# Altium PCB blinky.PcbDoc
Units mil, origin at the board's own origin, x right, y up, seen from the top; angles counter-clockwise.
Board outline 1000 x 800 mil, 2 copper layers (Top, Bottom), stack 0 mil thick; 3 components, 3 nets, 6 pads, 1 vias.
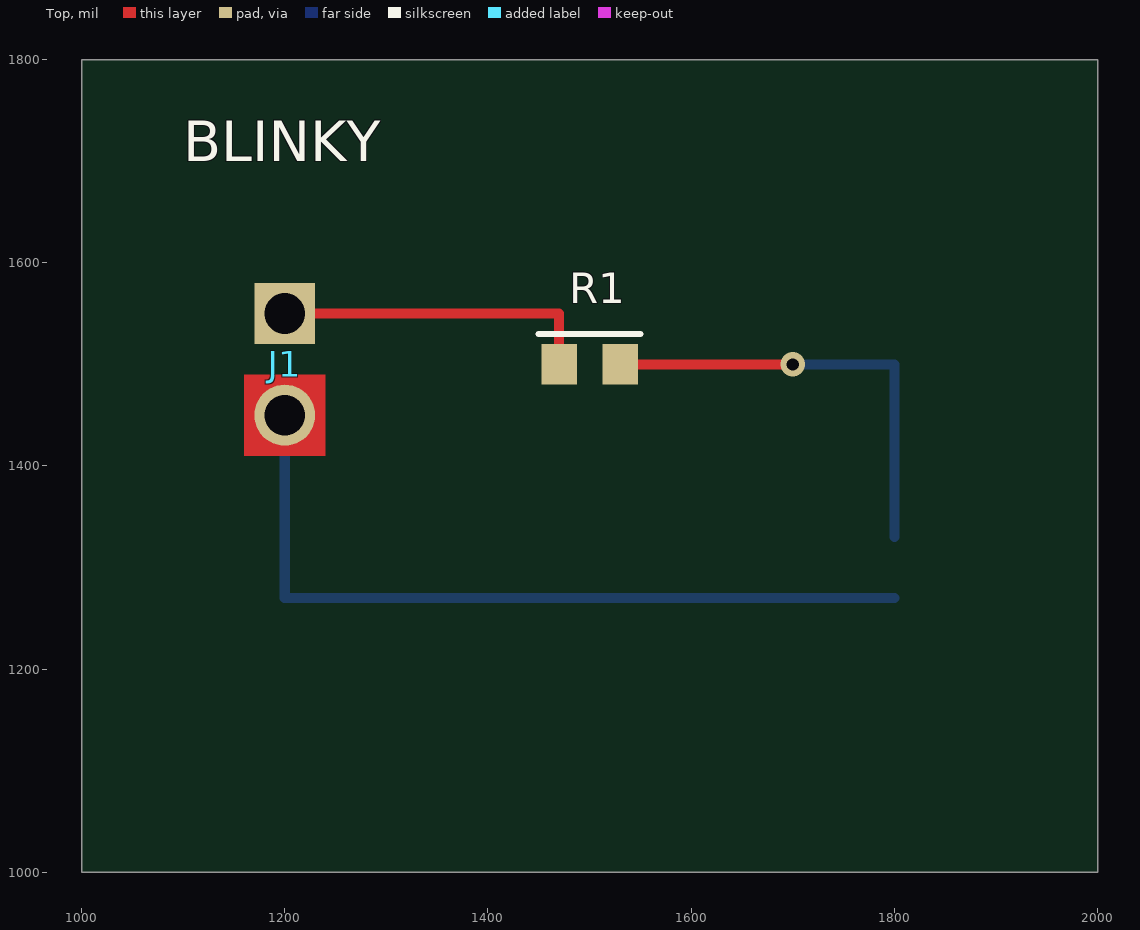
[diagram p0: Top view]
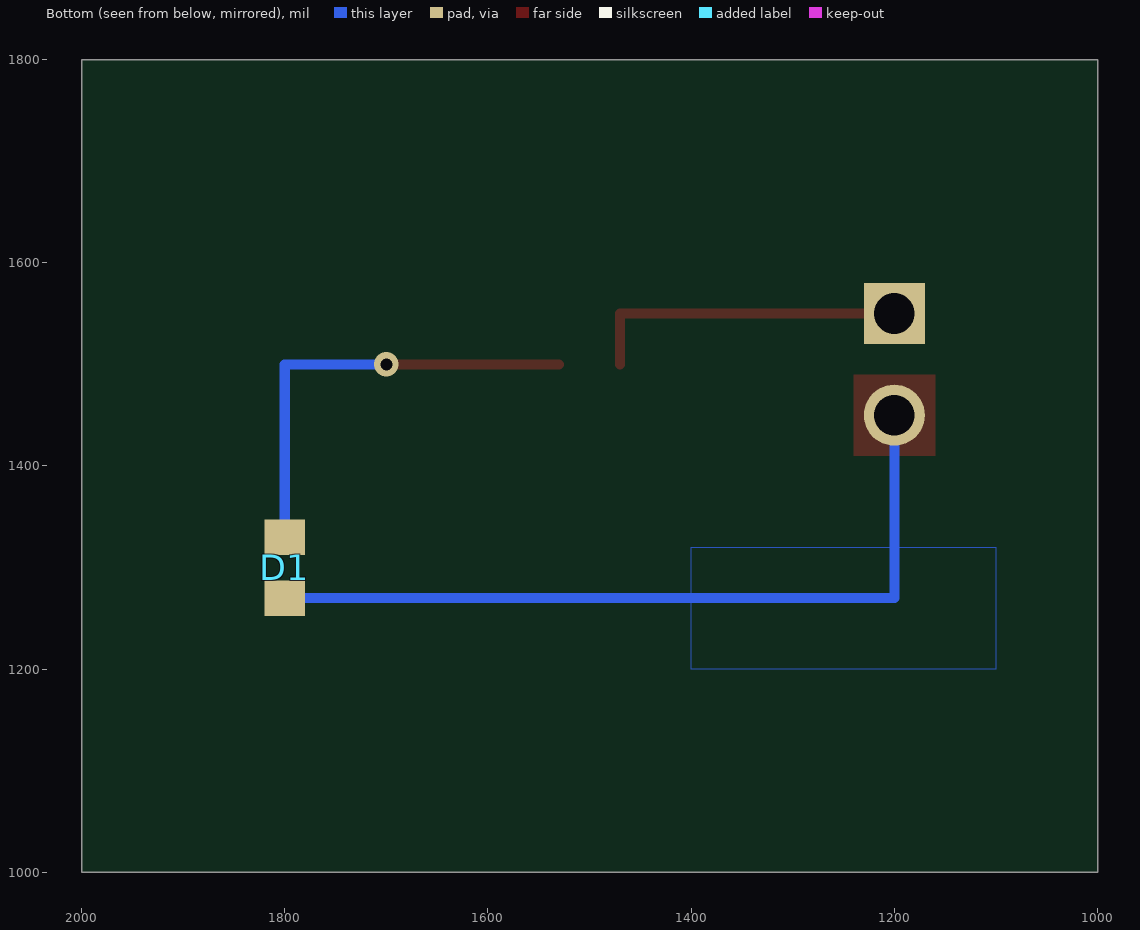
[diagram p1: Bottom view, seen from below]

## Layer stack, top to bottom

## Board outline
1000,1000 2000,1000 2000,1800 1000,1800

## Design rules (kind name [scope] priority, off if disabled: settings)
Clearance [All] p0: gap=8
HoleSize [All] p0: minlimit=10 maxlimit=100
PolygonConnect PolygonConnect_1 [InNet('GND')] p1: connectstyle=Direct reliefconductorwidth=10 reliefentries=4 airgapwidth=10
PolygonConnect [All] p2: thpad.connectstyle=Relief thpad.reliefconductorwidth=12 thpad.airgapwidth=10 smdpad.connectstyle=Relief smdpad.reliefconductorwidth=8 smdpad.airgapwidth=10 via.connectstyle=Direct
PolygonConnect PolygonConnect_2 [HasFootprint('J1')] p3: connectstyle=NoConnect
ShortCircuit [All] p0: allowed=FALSE
Width [All] p0: minlimit=8 maxlimit=100 preferedwidth=10
Width PowerWidth [InNetClass('Power')] p0: minlimit=10 maxlimit=100 preferedwidth=10

## Classes and differential pairs
net class Power: GND VCC

## Components (designator, comment, footprint, x,y, rotation, side; value= is the part's Value field where it differs from the comment)
D1 "" LED0603 1800,1300 r90 bottom
J1 "" HDR1X2 1200,1500 r0 top locked
R1 "" R0603 1500,1500 r0 top

## Footprints (in the part's own frame and the unit in brackets; to place one, negate y for a bottom-side part, rotate by r counter-clockwise, add the part's x,y. Pads: shape width x height; smd on the part's side, far side on the other; paste and mask are expansions set on the pad)
HDR1X2 [mil]
  rect 60x60 hole 40: 1(0,50)
  round 60 hole 40: 2(0,-50)
LED0603 [mil]
  rect 35x40 smd: 1(30,0) 2(-30,0)
R0603 [mil]
  rect 35x40 smd: 1(-30,0) 2(30,0)
  silkscreen extent -50,30 50,30

## Via types
v1: diameter 24, hole 12, Top to Bottom, 1 vias

## Nets (pads, with @x,y where several pads share a name; then routed paths per layer and width w, separated by ;. In a path a pad name is that pad's centre, name@x,y a point inside that pad or via, vN(x,y) a via of type N, cw(c..) or ccw(c..) an arc to the next point about the centre after c; other vN are vias at no path point)
GND: D1.2 J1.2 | length 780
  Bottom w10: J1.2 1200,1270 D1.2
LED_A: D1.1 R1.2 | length 440
  Top w10: R1.2 v1(1700,1500)
  Bottom w10: v1(1700,1500) 1800,1500 D1.1
VCC: J1.1 R1.1 | length 320
  Top w10: J1.1 1470,1550 R1.1

## Polygon pours and split planes (outlines as drawn)
GND on Bottom (solid): 1100,1200 1400,1200 1400,1320 1100,1320

## Other copper
Top:
  region net GND: 1160,1410 1240,1410 1240,1490 1160,1490
Bottom:
  pour cut-out: 1300,1230 1350,1230 1350,1280 1300,1280

## Silkscreen, mask and mechanical layers (free items; w line width, h text height)
Top Overlay:
  text "BLINKY" at 1100,1700 h40